# Altium PCB PCB-PWR.PcbDoc (part 2 of 2)
Units mm, origin at the board's own origin, x right, y up, seen from the top; angles counter-clockwise.
Board outline 152.4 x 101.6 mm, 20 copper layers (F.Cu, F.Mask, B.Cu, B.Mask, In1.Cu, F.SilkS, In2.Cu, B.SilkS, F.Adhes, B.Adhes, F.Paste, B.Paste, Dwgs.User, Cmts.User, Eco1.User, Eco2.User, Edge.Cuts, Margin, B.CrtYd, F.CrtYd); 66 components, 31 nets, 210 pads, 267 vias.
Unrouted connection lines stored in the file: 6.
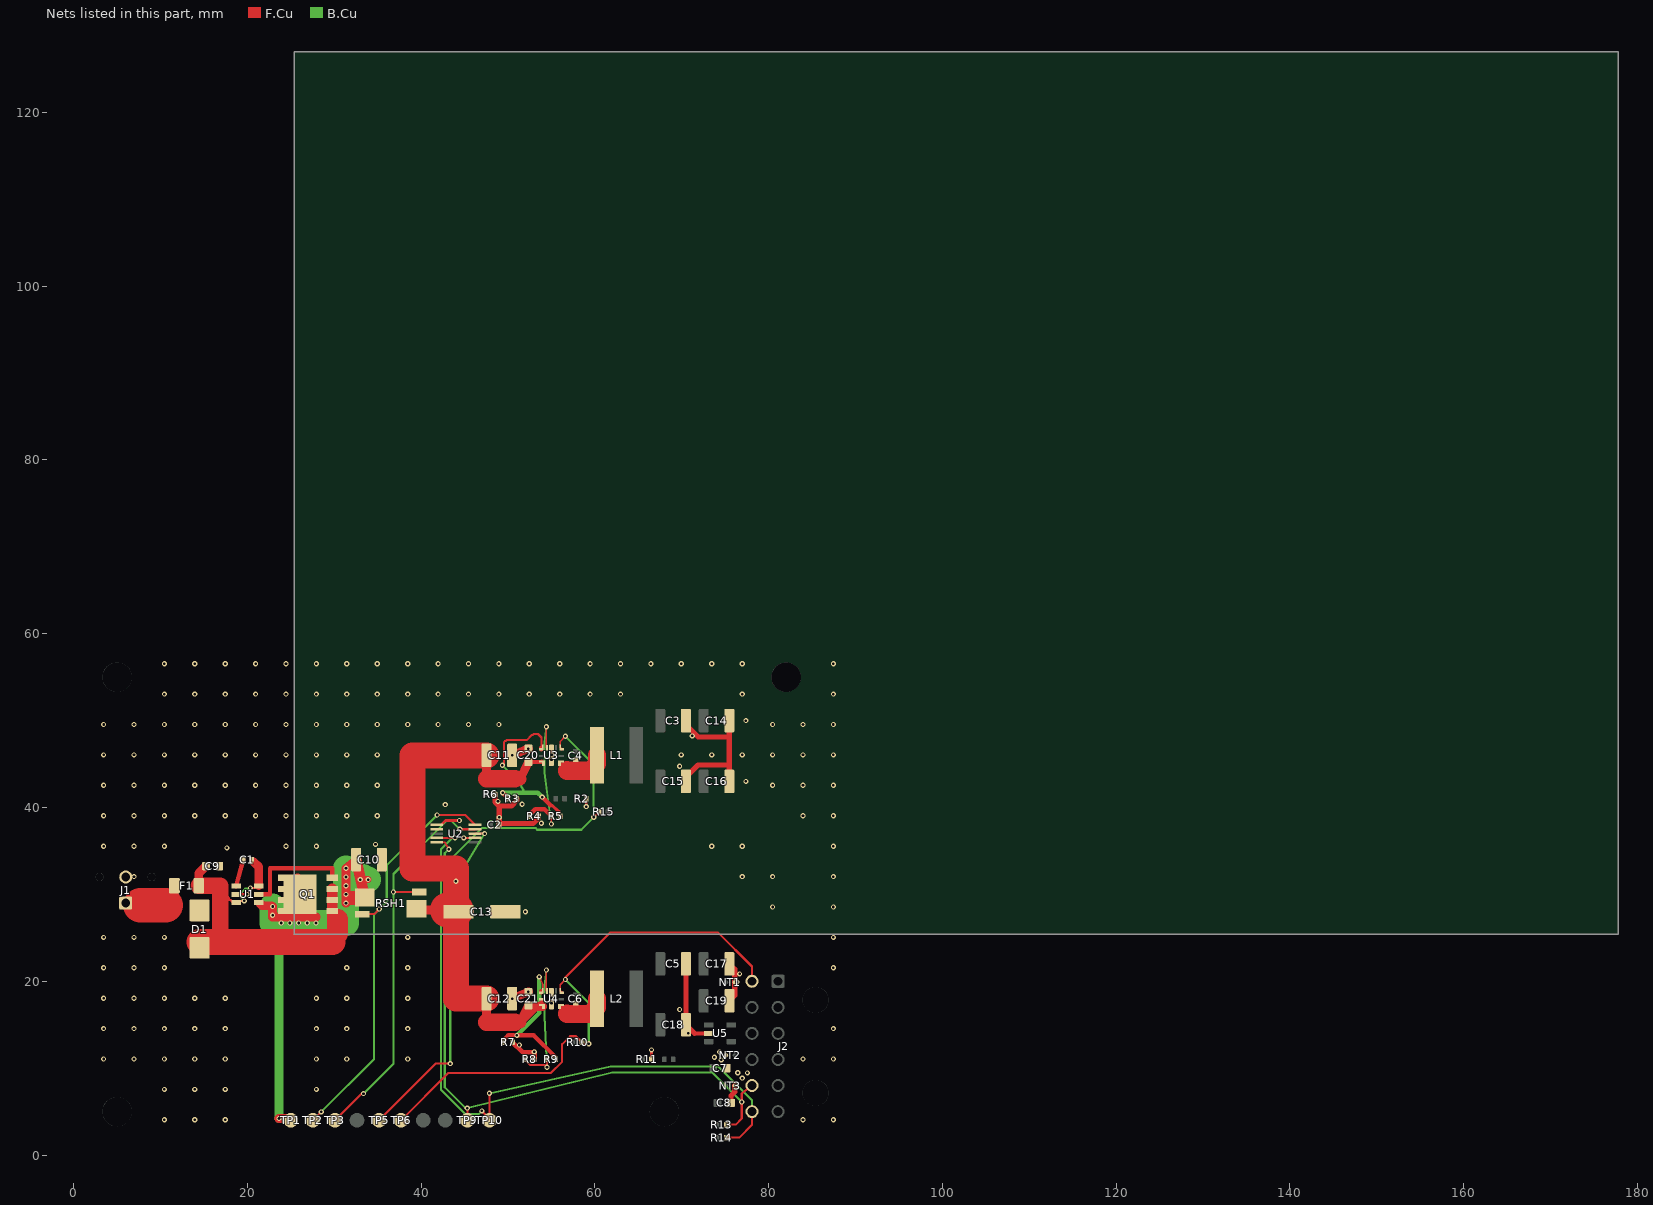
[diagram p10: the nets of this part, all layers, seen from the top]

## Via types
v1: diameter 0.6, hole 0.3, F.Cu to B.Cu, tented both sides, 267 vias

## Nets (pads, with @x,y where several pads share a name; then routed paths per layer and width w, separated by ;. In a path a pad name is that pad's centre, name@x,y a point inside that pad or via, vN(x,y) a via of type N, cw(c..) or ccw(c..) an arc to the next point about the centre after c; other vN are vias at no path point) (continued)
GND_PWR: C2.2 C3.2 C5.2 C7.2 C8.2 C9.2 C10.2 C11.2 C12.2 C13.2 C14.2 C15.2 C16.2 C17.2 C18.2 C19.2 C20.2 C21.2 D1.2 J1.2 NT1.2 NT2.2 NT3.2 R2.2 R3.2 R4.2 R6.2 R7.2 R8.2 R11.2 U1.2 U2.1 U2.2 U2.7 U3.2 U4.2 U5.2 | length 62.2
  F.Cu w0.2: v1(44.9,36.5) U2.7@46.2,36.5
  F.Cu w0.3: U1.2@18.7,30 v1(20,30) ; U2.1@42.3,38 42.8,38.5 v1(44.4,38.5) ; v1(59.01,40.1) R2.2@59.01,41 ; R11.2@66.51,11 v1(66.51,12.1)
  F.Cu w0.45: 71.463,14.002 71.465,14 U5.2@73.1,14
  F.Cu w0.541: R7.2@50.51,13 51.689,11.821 v1@53.01,11.821
  F.Cu w0.6: R6.2@48.51,41.5 48.51,40.648 48.98,40.178 ; C2.2@48.98,38 C2.2@48.98,38.156 ; R3.2@51.01,41 51.01,40.799 50.389,40.178 48.98,40.178 ; R8.2@53.01,11 v1@53.01,11.821 ; R4.2@53.51,39 53.51,38.789 52.877,38.156 C2.2@48.98,38.156 ; U4.2@55,18 v1(55,18.075) ; U3.2@55,46 v1(55,46.075) ; C5.2@70.475,22 C18.2@70.475,15 71.463,14.012 71.463,14.002 ; C15.2@70.475,43 70.475,43.474 71.878,44.877 75.475,44.877 ; C3.2@70.475,50 70.475,49.526 71.894,48.108 75.475,48.108 ; C19.2@75.475,17.75 76.1,18.375 NT1.2@76.1,19.88 76.1,21.375 C17.2@75.475,22 ; C16.2@75.475,43 75.475,44.877 ; C14.2@75.475,50 75.475,48.108 ; C8.2@75.675,6 75.675,6.825 76.1,7.25 NT3.2@76.1,8 ; C2.2@48.98,38.156 48.98,40.178 ; 75.475,44.877 75.475,48.108
  F.Cu w1: v1(50.475,18) v1(52.35,18.775) ; v1(50.475,46) v1(52.35,46.775)
  other v1: 10.45,4.05 13.95,4.05 17.45,4.05 83.95,4.05 87.45,4.05 10.45,7.55 13.95,7.55 17.45,7.55 27.95,7.55 76.95,8.85 77.55,9.45 76.445,9.474 74.55,10.95 3.45,11.05 6.95,11.05 10.45,11.05 13.95,11.05 17.45,11.05 27.95,11.05 31.45,11.05 38.45,11.05 83.95,11.05 87.45,11.05 73.75,11.25 53.01,11.87 74.35,11.85 51.314,12.667 70.75,14 3.45,14.55 6.95,14.55 10.45,14.55 13.95,14.55 17.45,14.55 27.95,14.55 31.45,14.55 38.45,14.55 87.45,14.55 69.748,16.755 55,17.475 3.45,18.05 6.95,18.05 10.45,18.05 13.95,18.05 17.45,18.05 27.95,18.05 31.45,18.05 38.45,18.05 76.336,19.921 76.65,20.85 3.45,21.55 6.95,21.55 10.45,21.55 31.45,21.55 38.45,21.55 87.45,21.55 3.45,25.05 6.95,25.05 10.45,25.05 38.45,25.05 87.45,25.05 52,28 80.45,28.55 87.45,28.55 6.95,32.05 76.95,32.05 80.45,32.05 87.45,32.05 17.646,35.352 3.45,35.55 6.95,35.55 10.45,35.55 24.45,35.55 27.95,35.55 73.45,35.55 76.95,35.55 87.45,35.55 34.748,35.755 53.843,38.196 48.98,38.86 3.45,39.05 6.95,39.05 10.45,39.05 13.95,39.05 17.45,39.05 20.95,39.05 24.45,39.05 27.95,39.05 31.45,39.05 34.95,39.05 83.95,39.05 87.45,39.05 42.766,40.333 51.625,40.385 48.843,40.696 3.45,42.55 6.95,42.55 10.45,42.55 13.95,42.55 17.45,42.55 20.95,42.55 24.45,42.55 27.95,42.55 31.45,42.55 34.95,42.55 80.45,42.55 83.95,42.55 87.45,42.55 77.375,43 69.748,44.755 55,45.475 3.45,46.05 6.95,46.05 10.45,46.05 13.95,46.05 17.45,46.05 20.95,46.05 24.45,46.05 27.95,46.05 31.45,46.05 34.95,46.05 69.95,46.05 73.45,46.05 76.95,46.05 80.45,46.05 83.95,46.05 87.45,46.05 71.202,48.245 3.45,49.55 6.95,49.55 10.45,49.55 13.95,49.55 17.45,49.55 20.95,49.55 24.45,49.55 27.95,49.55 31.45,49.55 34.95,49.55 38.45,49.55 41.95,49.55 45.45,49.55 48.95,49.55 80.45,49.55 83.95,49.55 87.45,49.55 77.375,50 10.45,53.05 13.95,53.05 17.45,53.05 20.95,53.05 24.45,53.05 27.95,53.05 31.45,53.05 34.95,53.05 38.45,53.05 41.95,53.05 45.45,53.05 48.95,53.05 52.45,53.05 55.95,53.05 59.45,53.05 62.95,53.05 76.95,53.05 87.45,53.05 10.45,56.55 13.95,56.55 17.45,56.55 20.95,56.55 24.45,56.55 27.95,56.55 31.45,56.55 34.95,56.55 38.45,56.55 41.95,56.55 45.45,56.55 48.95,56.55 52.45,56.55 55.95,56.55 59.45,56.55 62.95,56.55 66.45,56.55 69.95,56.55 73.45,56.55 76.95,56.55 87.45,56.55
I2C2_SCL: J2.11 R13.2 TP9.1 U2.5 | length 74.4
  F.Cu w0.2: U2.5@41.8,36 42.7,36 v1(43.2,35.2)
  F.Cu w0.25: TP9.1@45.32,4 v1(45.32,5.4) ; R13.2@75.11,3.5 76.2,3.5 76.9,4.2 76.9,7.1 J2.11@78.08,8
  B.Cu w0.25: v1(43.2,35.2) 42.726,34.726 42.726,7.801 45.127,5.4 v1(45.32,5.4) 62,9.5 73.5,9.5 v1(76.9,6.1)
I2C2_SDA: J2.12 R14.2 TP10.1 U2.4 | length 81.1
  F.Cu w0.2: U2.4@41.8,36.5 v1(43.9,36.5)
  F.Cu w0.25: v1(46.994,5.075) 47.86,4.209 TP10.1@47.86,4 v1(47.86,7.1) ; R14.2@75.11,2 76.6,2 78.08,3.5 J2.12@78.08,5
  B.Cu w0.25: v1(43.9,36.5) 43.613,36.5 42.275,35.161 42.275,7.532 45.097,4.71 46.629,4.71 v1(46.994,5.075) ; v1(47.86,7.1) 61.8,10.2 74.2,10.2 78.08,6.32 J2.12@78.08,5
LM74700_VCAP: C1.1 U1.1 | length 3.2
  F.Cu w0.5: U1.1@18.7,30.95 C1.1@19.52,34
MODE_3V3: R8.1 R9.1 U4.7 | length 17.2
  F.Cu w0.2: U4.7@54.415,18.875 v1(54.415,21.3) ; v1(54.49,10.1) R9.1@54.49,11
  F.Cu w0.25: R8.1@52.05,10.85 52.55,10.35 54.25,10.35 54.35,10.25 v1@54.45,10.25
  B.Cu w0.2: v1(54.415,21.3) 54.2,19.5 54.2,16 v1(54.49,10.1)
MODE_3V8: R4.1 R5.1 U3.7 | length 17.8
  F.Cu w0.2: U3.7@54.415,46.875 v1(54.415,49.3) ; v1(54.99,38.1) R5.1@54.99,39
  F.Cu w0.5: R4.1@52.49,39 52.49,39.156 53.128,39.794 54.196,39.794 R5.1@54.99,39
  B.Cu w0.2: v1(54.415,49.3) 54.2,47.5 54.2,44 v1(54.99,38.1)
PG_3V8: R15.1 TP5.1 U3.5 | length 66.5
  F.Cu w0.2: U3.5@56,47.1 56,47.6 v1(56.6,48.2)
  F.Cu w0.201: U3.5@56,47.1 U3.5@56,46.9 56.01,46.9 U3.5@56.112,46.798
  F.Cu w0.25: TP5.1@35.16,4 41.686,10.526 v1(43.357,10.526) ; U3.5@56.112,46.798 56.175,46.735 U3.5@56.175,46.7 ; v1(59.857,38.867) R15.1@60.49,39.5
  B.Cu w0.25: v1(43.357,10.526) 43.357,33.978 47.031,37.652 53.156,37.652 53.363,37.444 58.435,37.444 v1(59.857,38.867) 59.857,44.943 v1(56.6,48.2)
PWR_GOOD: J2.7 R10.2 TP6.1 U4.5 | length 64.7
  F.Cu w0.2: U4.5@56,19.1 56,19.6 v1(56.6,20.2)
  F.Cu w0.201: U4.5@56,19.1 U4.5@56,18.9 56.01,18.9 U4.5@56.112,18.798
  F.Cu w0.25: TP6.1@37.7,4 43.16,9.46 54.944,9.46 56.225,10.741 56.225,12.751 57.149,13.676 57.834,13.676 R10.2@58.51,13 58.71,12.8 v1(59.296,12.8) ; U4.5@56.112,18.798 56.175,18.735 U4.5@56.175,18.7 ; v1(56.6,20.2) 56.6,20.429 61.797,25.627 74.148,25.627 78.08,21.695 J2.7@78.08,20
  B.Cu w0.25: v1(56.6,20.2) 59.296,17.504 v1(59.296,12.8)
REV_GATE: Q1.4 U1.5 | length 12.6
  F.Cu w0.5: U1.5@21.3,30 22.6,30 22.6,33 29.77,33 Q1.4@29.77,31.905
RT_3V3: R7.1 R9.2 U4.8 | length 17.6
  F.Cu w0.2: v1(53.6,20.5) 54,19.7 U4.8@54,19.1
  F.Cu w0.201: 53.825,18.86 53.865,18.9 U4.8@54,18.9 U4.8@54,19.1
  F.Cu w0.375: 50.667,13.81 50.707,13.771 v1(51.018,13.771) v1(51.018,13.771)
  F.Cu w0.5: R7.1@49.49,13 49.49,13.256 50.045,13.81 50.667,13.81 ; v1(51.018,13.771) 52.953,13.771 55.51,11.214 R9.2@55.51,11 ; U4.8@53.825,18.7 53.825,18.86
  B.Cu w0.5: v1(51.018,13.771) 53.6,16.353 v1(53.6,20.5)
RT_3V8: R3.1 R5.2 U3.8 | length 22.1
  F.Cu w0.201: 53.825,46.86 53.865,46.9 U3.8@54,46.9
  F.Cu w0.25: v1(49.35,44.85) 49.55,45.05 49.55,47.55 49.65,47.65 49.75,47.65 49.85,47.75 52.15,47.75 52.75,48.35 52.85,48.35 52.95,48.45 53.45,48.45 53.85,48.05 53.85,46.95
  F.Cu w0.375: 54.909,40.229 55.114,40.229 55.8,39.543
  F.Cu w0.5: v1(49.372,41.705) 49.99,41.088 R3.1@49.99,41 ; U3.8@53.825,46.7 53.825,46.86 ; v1(53.939,41.199) 54.909,40.229 ; 55.8,39.543 55.8,39.21 R5.2@56.01,39
  B.Cu w0.25: v1(49.35,44.85) 51.35,42.85 51.35,42.75 51.45,42.65 51.45,42.55 51.55,42.45 51.55,42.35 51.65,42.25 51.65,42.15 51.75,42.05 51.75,41.85 51.85,41.75
  B.Cu w0.5: v1(49.372,41.705) 53.433,41.705 v1(53.939,41.199)
SHUNT_LOAD_SENSE: RSH1.4 TP3.1 U2.9 | length 46.5
  F.Cu w0.25: TP3.1@30.08,4 33.147,7.067 v1(33.362,7.067) ; v1(36.811,30.27) RSH1.4@39.78,30.27 ; v1(44.45,37.5) U2.9@46.2,37.5
  B.Cu w0.25: v1(33.362,7.067) 36.811,10.516 v1(36.811,30.27) 36.811,32.351 42.887,38.427 43.523,38.427 v1(44.45,37.5)
SHUNT_SOURCE_SENSE: RSH1.3 TP2.1 U2.10 | length 48.1
  F.Cu w0.25: TP2.1@27.54,4 v1(28.504,4.964) ; RSH1.3@33.22,27.73 34.397,27.73 34.59,27.73 v1(35.18,28.32) ; v1(41.841,39.132) 45.067,39.132 U2.10@46.2,38
  B.Cu w0.25: v1(28.504,4.964) 34.59,11.05 34.59,27.73 v1(35.18,28.32) 36.043,29.183 36.043,33.335 v1(41.841,39.132)
SW_3V3: C6.2 L2.1 U4.3 | length 6
  F.Cu w0.251: U4.3@56.086,17.013 56.75,16.35
  F.Cu w0.346: U4.3@55.927,17.1 56,17.1 U4.3@56.086,17.013
  F.Cu w0.561: 56.75,16.349 56.8,16.3
  F.Cu w2.1: 56.8,16.3 56.8,16.22 59.45,16.22 60.24,17.01 L2.1@60.24,18
SW_3V8: C4.2 L1.1 U3.3 | length 6
  F.Cu w0.251: U3.3@56.086,45.013 56.75,44.35
  F.Cu w0.346: U3.3@55.927,45.1 56,45.1 U3.3@56.086,45.013
  F.Cu w0.561: 56.75,44.349 56.8,44.3
  F.Cu w2.1: 56.8,44.3 56.8,44.22 59.45,44.22 60.24,45.01 L1.1@60.24,46
VBAT_FUSED: C1.2 C9.1 D1.1 F1.2 Q1.1 Q1.2 Q1.3 U1.3 U1.6 | length 45.9
  F.Cu w0.25: 17.25,30.25 17.75,29.75 17.75,29.65 17.85,29.55 17.85,29.45 17.95,29.35 18.05,29.35 18.25,29.15 U1.3@18.35,29.15 ; U1.3@19.05,29.15 19.15,29.25 v1(19.65,29.25) ; v1(20.35,30.75) 20.85,30.75 U1.6@20.95,30.85
  F.Cu w0.561: C1.2@20.48,34 C1.2@20.749,33.731
  F.Cu w0.601: U1.6@21.3,30.95 U1.6@21.3,31.002
  F.Cu w1: F1.2@14.4,31 14.4,32.425 C9.1@15.225,33.25 ; D1.1@14.5,23.85 15.15,24.5 16.9,24.5 ; C1.2@20.749,33.731 21.3,33.18 U1.6@21.3,31.002
  F.Cu w1.2: 29.77,24.5 Q1.3@29.77,30.635
  F.Cu w1.9: F1.2@14.4,31 16.9,31 16.9,24.5
  F.Cu w2.4: 30.4,25.5 30.4,27.1
  F.Cu w3: D1.1@14.5,24.5 29.77,24.5
  B.Cu w0.25: v1(19.65,29.25) 19.35,29.55 19.35,30.25 19.75,30.65 20.25,30.65 v1(20.35,30.75)
VBAT_PROTECTED: C10.1 Q1.5 Q1.6 Q1.7 Q1.8 RSH1.1 TP1.1 U1.4 | length 70.8
  F.Cu w0.601: U1.4@21.3,29.05 U1.4@21.471,28.879 ; 21.643,28.707 U1.4@21.643,28.879
  F.Cu w0.8: v1(33,31.7) v1(33.9,31.7)
  F.Cu w1: U1.4@21.471,28.879 U1.4@21.643,28.879 ; 21.643,28.707 22.793,28.707 v1(22.9,28.6) 22.9,27.4 27.9,27.4 ; v1(23.646,4.2) 24.8,4.2 TP1.1@25,4 ; Q1.8@25.764,28.095 25.764,28.435 Q1.5@26.059,28.73 26.059,29.07 Q1.7@25.764,29.365 25.764,29.705 Q1.5@26.059,30 25.764,30.295 Q1.6@25.764,30.635 26.059,30.93 Q1.5@26.059,31.27 25.764,31.565 Q1.5@25.764,31.905 ; v1(31.35,29) v1(31.35,33) C10.1@32.525,34 ; v1(31.35,30) v1(31.35,31) ; RSH1.1@32.6,29.6 33.48,29.6 RSH1.1@33.515,29.635
  F.Cu w1.2: C10.1@32.525,34 RSH1.1@33.515,29.635
  F.Cu w1.6: 31.85,29.6 RSH1.1@32.6,29.6
  B.Cu w1: v1(23.646,4.2) 23.646,26.446 v1(23.9,26.7) ; v1(31.35,31) v1(31.35,32)
  B.Cu w3: v1(22.9,28.6) 22.9,26.7 31.35,26.7 v1(31.35,33) v1(33.9,31.7)
  other v1: 24.9,26.7 25.9,26.7 26.9,26.7 27.9,26.7 22.9,27.6
VBAT_RAW: F1.1 J1.1 | length 7.4
  F.Cu w1: J1.1@6,29 6.25,28.75 7.7,28.75 ; 10.6,28.75 11.6,29.75 F1.1@11.6,31
  F.Cu w4: 7.7,28.75 10.6,28.75
VBAT_SYS: C11.1 C12.1 C13.1 C20.1 C21.1 RSH1.2 U2.8 U3.1 U4.1 U4.9 | length 82.6
  F.Cu w0.2: U2.8@46.2,37 v1(47.3,37)
  F.Cu w0.25: U4.9@53.875,17.925 U4.1@53.9,17.25
  F.Cu w0.251: U3.1@53.897,45.275 U3.1@54.073,45.1
  F.Cu w0.346: U4.1@53.998,17.1 U4.1@54.073,17.1
  F.Cu w0.5: C21.1@52.35,17.225 U4.1@53.9,17.25 ; C20.1@52.35,45.225 U3.1@53.9,45.25
  F.Cu w1: RSH1.2@39.485,28.365 39.65,28.2 40,28.2 C13.1@43,28.2 ; C13.1@44,28.2 44.2,28 C13.1@44.3,28 ; 47.525,15.3 C12.1@47.525,18 ; 47.525,43.3 C11.1@47.525,46 ; 51.4,43.3 C20.1@52.35,45.225 ; C21.1@52.35,17.225 51.4,15.3 53.2,17.1 53.897,17.1 ; U4.1@53.897,17.275 53.897,17.1 ; U4.1@53.998,17.1 53.897,17.1
  F.Cu w1.5: 50.8,15.3 51.4,15.3 ; 50.8,43.3 51.4,43.3
  F.Cu w2: 47.525,15.3 50.8,15.3 ; 47.525,43.3 50.8,43.3
  F.Cu w3: C12.1@47.525,18 44,18 44,28.2 44,33 39,33 39,46 C11.1@47.525,46
  F.Cu w4: C13.1@43,28.2 C13.1@44,28.2
  B.Cu w0.25: v1(44,31.5) v1(47.3,37)
pads on no net: H1.Un1 H2.Un1 H3.Un1 H4.Un1 J1.Un1 J1.Un2 J2.Un1 J2.Un2 Q1.Un1 Q1.Un2 Q1.Un3 Q1.Un4 Q1.Un5 Q1.Un6 Q1.Un7 Q1.Un8 Q1.Un9 Q1.Un10 Q1.Un11 Q1.Un12 Q1.Un13 Q1.Un14 Q1.Un15 Q1.Un16 U3.Un1 U3.Un2 U3.Un3 U3.Un4 U3.Un5 U3.Un6 U3.Un7 U4.Un1 U4.Un2 U4.Un3 U4.Un4 U4.Un5 U4.Un6 U4.Un7 U5.4
copper on no net: | length 300
  Edge.Cuts w0.254: 0,0 90,0 90,60 0,60 0,0

## Polygon pours and split planes (outlines as drawn)
VBAT_RAW on F.Cu "F.Cu-VBAT_RAW" (solid, remove dead copper, pour order 48): 13.146,28.481 13.448,28.985 13.59,29.554 13.6,31 13.514,31.581 13.263,32.111 12.869,32.546 12.365,32.848 11.796,32.99 11.404,32.99 11.019,32.914 10.657,32.764 10.186,32.414 9.836,31.943 9.686,31.581 9.61,31.196 9.6,30.75 6.966,30.75 6.581,30.914 6,31 5.419,30.914 4.889,30.663 4.454,30.269 4.152,29.765 4.01,29.196 4.01,28.804 4.086,28.419 4.236,28.057 4.454,27.731 4.836,27.336 5.139,27.087 5.669,26.836 6.054,26.76 10.6,26.75 10.99,26.788 11.543,26.986 11.869,27.204
VBAT_SYS on F.Cu "F.Cu-VBAT_SYS-1" (solid, remove dead copper, pour order 51): 152 vertices, not listed, extent 37,13.3 56.072,48
3V3_DIGITAL on F.Cu "F.Cu-3V3_DIGITAL-3" (solid, remove dead copper, pour order 36): 49.447,38.633 49.261,38.861 49.033,39.047 48.635,39.235 48.347,39.293 48.053,39.293 47.765,39.235 47.493,39.123 47.248,38.96 47.041,38.752 46.814,38.374 46.707,37.947 46.7,37.5 46.053,37.493 45.626,37.386 45.367,37.247 45.139,37.061 44.877,36.707 44.729,36.293 44.707,35.853 44.814,35.426 45.04,35.048 45.248,34.84 45.493,34.677 45.765,34.565 46.053,34.507 47.847,34.507 48.274,34.614 48.652,34.84 49.359,35.548 49.586,35.926 49.671,36.207 49.7,36.5 49.693,37.947 49.586,38.374
GND_PWR on F.Cu "F.Cu-GND_PWR" (solid, remove dead copper, pour order 52): 0.45,59.55 89.55,59.55 89.55,0.45 0.45,0.45
3V8_MODEM on F.Cu "F.Cu-3V8_MODEM-1" (solid, remove dead copper, pour order 39): 49.029,9.425 48.757,9.537 48.322,9.602 47.15,9.602 46.714,9.537 46.316,9.349 45.99,9.053 45.764,8.676 45.678,8.394 45.657,7.955 45.764,7.528 45.99,7.15 46.198,6.942 46.576,6.716 46.857,6.63 47.7,6.602 47.912,6.39 47.895,3.948 34.793,3.948 33.681,5.061 33.453,5.247 33.055,5.435 32.62,5.5 32.185,5.435 31.913,5.323 31.668,5.159 31.373,4.833 31.185,4.435 31.127,4.147 31.127,3.853 31.185,3.565 31.297,3.293 31.461,3.048 33.111,1.387 33.339,1.201 33.598,1.062 34.025,0.955 48.516,0.948 48.952,1.012 49.224,1.125 49.468,1.288 50.571,2.392 50.798,2.769 50.883,3.051 50.912,3.343 50.912,7.012 50.847,7.447 50.659,7.845 50.472,8.072 49.382,9.162
VBAT_FUSED on F.Cu "F.Cu-VBAT_FUSED" (solid, remove dead copper, pour order 44): 12.552,33.19 12.41,32.621 12.4,31 12.438,30.61 12.636,30.057 12.854,29.731 13.131,29.454 13.635,29.152 14.204,29.01 14.9,29 14.9,26.5 14.11,26.462 13.735,26.348 13.389,26.163 13.086,25.914 12.837,25.611 12.652,25.265 12.538,24.89 12.5,24.5 12.529,24.175 12.51,23.654 12.652,23.085 12.837,22.739 13.086,22.436 13.389,22.187 13.735,22.002 14.304,21.86 14.89,21.888 15.443,22.086 15.769,22.304 15.978,22.5 29.966,22.51 30.351,22.586 30.713,22.736 31.184,23.086 31.534,23.557 31.699,23.982 32.063,24.389 32.248,24.735 32.39,25.304 32.39,27.296 32.314,27.681 32.164,28.043 31.946,28.369 31.77,28.554 31.77,30.635 31.732,31.025 31.534,31.578 31.316,31.904 30.881,32.298 30.535,32.483 30.16,32.597 29.77,32.635 29.38,32.597 29.005,32.483 28.659,32.298 28.356,32.049 28.107,31.746 27.922,31.4 27.808,31.025 27.77,30.635 27.77,26.5 18.9,26.5 18.9,27.157 19.246,27.16 19.672,27.251 20.04,27.288 20.415,27.402 20.761,27.587 21.064,27.836 21.313,28.139 21.498,28.485 21.618,28.903 22.243,29.186 22.569,29.404 22.846,29.681 23.148,30.185 23.262,30.56 23.3,30.95 23.29,33.376 23.214,33.761 23.064,34.123 22.714,34.594 21.749,35.546 21.423,35.764 21.061,35.914 20.676,35.99 20.284,35.99 19.899,35.914 19.369,35.663 19.066,35.414 18.817,35.111 18.632,34.765 18.518,34.39 18.49,33.804 18.632,33.235 18.817,32.889 19.239,32.413 18.936,32.164 18.697,31.874 18.446,32.269 18.011,32.663 17.665,32.848 17.204,32.974 17.215,33.446 17.139,33.831 16.888,34.361 16.639,34.664 16.168,35.014 15.615,35.212 15.225,35.25 14.835,35.212 14.46,35.098 14.114,34.913 13.811,34.664 12.986,33.839 12.737,33.536
GND_DIGITAL on F.Cu "F.Cu-GND_DIGITAL" (solid, remove dead copper, pour order 40): 75.8,13.6 82.6,13.6 82.6,9.6 75.8,9.6
3V3_DIGITAL on F.Cu "F.Cu-3V3_DIGITAL-2" (solid, remove dead copper, pour order 35): 56.832,21.633 56.537,21.959 56.159,22.186 55.732,22.293 55.438,22.293 55.011,22.186 54.633,21.959 54.425,21.752 54.199,21.374 54.114,21.093 54.085,20.8 54.085,18.875 54.114,18.582 54.199,18.301 54.425,17.923 54.633,17.715 55.011,17.489 55.292,17.404 55.585,17.375 55.878,17.404 56.159,17.489 56.418,17.628 56.646,17.814 56.832,18.042 56.971,18.301 57.056,18.582 57.085,18.875 57.085,20.8 57.02,21.235
GND_MODEM on F.Cu "F.Cu-GND_MODEM" (solid, remove dead copper, pour order 42): 73.603,20.483 73.227,19.957 73.079,19.543 73.05,19.25 73.05,18.195 72.879,17.743 72.85,17.45 72.879,17.157 72.964,16.876 73.103,16.617 73.289,16.389 73.517,16.203 73.776,16.064 74.057,15.979 74.35,15.95 74.643,15.979 75.057,16.127 75.302,16.29 75.71,16.698 75.936,17.076 76.043,17.503 76.05,18.653 76.373,19.143 76.485,19.415 76.55,19.85 76.521,20.143 76.436,20.424 76.297,20.683 76.002,21.009 75.624,21.236 75.197,21.343 74.757,21.321 74.343,21.173 73.989,20.911
3V3_DIGITAL on F.Cu "F.Cu-3V3_DIGITAL-1" (solid, remove dead copper, pour order 34): 207 vertices, not listed, extent 55.99,0.507 75.59,26.493
VBAT_PROTECTED on F.Cu "F.Cu-VBAT_PROTECTED-1" (solid, remove dead copper, pour order 47): 26.069,5.746 25.743,5.964 25.381,6.114 24.8,6.2 23.646,6.2 23.256,6.162 22.881,6.048 22.535,5.863 22.232,5.614 21.983,5.311 21.798,4.965 21.684,4.59 21.646,4.2 21.684,3.81 21.798,3.435 21.983,3.089 22.232,2.786 22.535,2.537 22.881,2.352 23.256,2.238 23.646,2.2 24.133,2.2 24.61,2.038 25,2 25.581,2.086 26.111,2.337 26.546,2.731 26.764,3.057 26.914,3.419 27,4 26.914,4.581 26.764,4.943 26.546,5.269
VBAT_PROTECTED on F.Cu "F.Cu-VBAT_PROTECTED" (solid, remove dead copper, pour order 46): 27.427,33.016 27.178,33.319 26.875,33.568 26.345,33.819 25.764,33.905 25.183,33.819 24.821,33.669 24.35,33.319 24.101,33.016 23.916,32.67 23.774,32.101 23.764,31.565 23.821,31.1 23.774,30.831 23.764,30.454 23.558,30.555 23.183,30.669 22.449,30.707 21.881,30.964 21.496,31.04 21.104,31.04 20.719,30.964 20.189,30.713 19.886,30.464 19.637,30.161 19.452,29.815 19.338,29.44 19.3,29.05 19.338,28.66 19.452,28.285 19.637,27.939 19.886,27.636 20.374,27.161 20.7,26.943 20.986,26.821 21.136,26.457 21.486,25.986 21.957,25.636 22.319,25.486 22.9,25.4 27.9,25.4 28.29,25.438 28.665,25.552 29.011,25.737 29.446,26.131 29.664,26.457 29.814,26.819 29.89,27.204 29.883,27.644 30.239,27.337 30.769,27.086 31.35,27 31.74,27.038 32.293,27.236 32.619,27.454 32.777,27.6 33.676,27.61 34.245,27.752 34.591,27.937 34.894,28.186 35.094,28.408 35.279,28.692 35.444,29.106 35.51,29.492 35.499,29.884 35.397,30.377 35.664,30.757 35.862,31.31 35.9,31.7 35.814,32.281 35.664,32.643 35.446,32.969 35.169,33.246 34.68,33.541 34.428,34.615 34.352,34.814 34.168,35.141 33.901,35.451 33.436,35.78 33.071,35.924 32.668,35.995 32.1,35.954 31.711,35.827 31.229,35.523 30.054,34.523 29.781,34.241 29.586,33.943 29.436,33.581 29.356,33.16 29.367,28.756 29.169,28.946 28.843,29.164 28.481,29.314 28.03,29.394 28.002,29.535 28.059,30 28.002,30.465 28.049,30.734 28.059,31.27 28.021,31.66 27.907,32.035 27.695,32.418 27.612,32.67
3V8_MODEM on F.Cu "F.Cu-3V8_MODEM" (solid, remove dead copper, pour order 38): 152 vertices, not listed, extent 54.05,18.507 85,54.7
VBAT_SYS on F.Cu "F.Cu-VBAT_SYS" (solid, remove dead copper, pour order 50): 48.243,35.236 48.569,35.454 48.963,35.889 49.214,36.419 49.29,36.804 49.262,37.39 49.148,37.765 48.846,38.269 48.569,38.546 48.065,38.848 47.69,38.962 47.3,39 46.004,38.99 45.619,38.914 45.257,38.764 44.931,38.546 44.654,38.269 44.436,37.943 44.286,37.581 44.21,37.196 44.21,36.804 44.286,36.419 44.436,36.057 44.654,35.731 44.931,35.454 45.435,35.152 46.004,35.01 47.496,35.01 47.881,35.086
3V3_DIGITAL on F.Cu "F.Cu-3V3_DIGITAL" (solid, remove dead copper, pour order 33): 62.833,40.207 62.669,40.452 62.343,40.747 61.945,40.935 61.657,40.993 61.363,40.993 60.936,40.886 60.677,40.747 60.35,40.452 60.124,40.074 60.039,39.793 60.01,39.5 60.017,38.453 60.075,38.165 60.187,37.893 60.35,37.648 60.558,37.44 60.803,37.277 61.075,37.165 61.363,37.107 61.657,37.107 61.945,37.165 62.217,37.277 62.462,37.44 62.669,37.648 62.896,38.026 63.003,38.453 63.003,39.647 62.945,39.935
VBAT_FUSED on B.Cu "B.Cu-VBAT_FUSED" (solid, remove dead copper, pour order 43): 21.664,29.236 22.013,29.639 22.264,30.169 22.35,30.75 22.312,31.14 22.114,31.693 21.896,32.019 21.461,32.413 21.115,32.598 20.74,32.712 20.35,32.75 19.36,32.612 18.985,32.498 18.481,32.196 17.936,31.664 17.687,31.361 17.502,31.015 17.388,30.64 17.35,30.25 17.36,29.354 17.502,28.785 17.687,28.439 17.936,28.136 18.381,27.704 18.885,27.402 19.454,27.26 19.846,27.26 20.415,27.402 20.761,27.587 21.064,27.836 21.414,28.307 21.564,28.669
3V3_DIGITAL on B.Cu "B.Cu-3V3_DIGITAL-2" (solid, remove dead copper, pour order 32): 84.421,22.293 84.336,22.574 84.197,22.833 83.902,23.159 83.524,23.386 83.097,23.493 76.5,23.5 76.207,23.471 75.866,23.359 71.366,21.259 71.113,21.109 70.894,20.913 70.647,20.548 70.517,20.128 70.515,19.688 70.641,19.266 70.791,19.013 70.987,18.794 71.222,18.617 71.487,18.49 71.772,18.417 72.066,18.401 72.357,18.443 72.634,18.541 76.833,20.5 81.45,20.5 81.45,16.22 80.141,15.17 79.931,14.964 79.701,14.589 79.612,14.309 79.58,14.017 79.606,13.724 79.688,13.441 79.91,13.061 80.115,12.851 80.49,12.621 80.771,12.532 81.063,12.5 81.356,12.526 81.639,12.608 81.899,12.744 83.902,14.34 84.197,14.667 84.38,15.049 84.45,15.483 84.45,22
3V8_MODEM on B.Cu "B.Cu-3V8_MODEM" (solid, remove dead copper, pour order 37): 65.574,24.158 65.16,24.01 64.898,23.831 53.326,23.831 53.034,23.802 52.753,23.717 52.375,23.49 46.089,17.215 45.902,16.987 45.764,16.728 45.678,16.447 45.65,16.154 45.65,8.102 45.678,7.809 45.764,7.528 45.99,7.15 46.198,6.942 46.576,6.716 47.003,6.609 47.297,6.609 47.724,6.716 47.983,6.854 48.309,7.15 48.472,7.395 48.585,7.666 48.65,8.102 48.65,15.533 53.948,20.831 65.51,20.831 65.946,20.896 66.24,21.022 69.906,17.367 70.15,17.204 70.422,17.091 70.857,17.026 79.607,17.026 79.899,17.055 80.314,17.204 80.667,17.466 82.24,19.048 82.403,19.293 82.515,19.565 82.58,20 82.551,20.293 82.466,20.574 82.24,20.952 82.032,21.16 81.654,21.386 81.373,21.471 81.08,21.5 80.645,21.435 80.247,21.247 80.019,21.061 78.985,20.027 71.479,20.027 67.757,23.748 67.53,23.934 67.27,24.073 66.843,24.18 65.867,24.187
VBAT_SYS on B.Cu "B.Cu-VBAT_SYS" (solid, remove dead copper, pour order 49): 42.285,32.529 42.06,31.987 42.002,31.599 42.022,31.207 42.192,30.646 42.393,30.309 42.656,30.019 42.971,29.785 43.325,29.617 43.706,29.522 44.097,29.502 44.673,29.617 45.027,29.784 45.342,30.017 45.715,30.471 49.015,35.971 49.183,36.325 49.298,36.901 49.24,37.485 49.108,37.854 48.783,38.342 48.492,38.606 48.156,38.808 47.787,38.94 47.399,38.997 47.007,38.978 46.627,38.883 46.273,38.716 45.958,38.482 45.585,38.029
VBAT_PROTECTED on B.Cu "B.Cu-VBAT_PROTECTED" (solid, remove dead copper, pour order 45): 33.548,29.731 34.135,29.714 34.518,29.798 35.043,30.059 35.47,30.461 35.762,30.971 35.869,31.348 35.886,31.935 35.733,32.501 35.421,32.999 35.138,33.27 34.808,33.482 32.115,34.848 31.74,34.962 31.311,35 30.96,34.962 30.732,34.902 30.407,34.764 30.207,34.641 29.936,34.414 29.78,34.238 29.568,33.908 29.436,33.581 29.381,33.352 29.35,33 29.35,28.7 24.895,28.7 24.862,28.99 24.748,29.365 24.563,29.711 24.314,30.014 23.843,30.364 23.481,30.514 23.096,30.59 22.51,30.562 21.957,30.364 21.486,30.014 21.237,29.711 21.052,29.365 20.91,28.796 20.91,26.504 20.986,26.119 21.136,25.757 21.354,25.431 21.646,25.143 21.656,4.004 21.798,3.435 22.1,2.931 22.377,2.654 22.881,2.352 23.45,2.21 23.842,2.21 24.227,2.286 24.757,2.537 25.192,2.931 25.41,3.257 25.56,3.619 25.636,4.004 25.646,24.7 31.546,24.71 31.931,24.786 32.461,25.037 32.764,25.286 33.013,25.589 33.198,25.935 33.312,26.31 33.35,26.7 33.35,29.777
GND_PWR on B.Cu "B.Cu-GND_PWR" (solid, remove dead copper, pour order 53): 0.45,59.55 89.55,59.55 89.55,0.45 0.45,0.45
GND_MODEM on B.Cu "B.Cu-GND_MODEM" (solid, remove dead copper, pour order 41): 76.624,18.836 76.197,18.943 74.35,18.95 73.915,18.885 73.517,18.697 73.289,18.511 73.103,18.283 72.964,18.024 72.879,17.743 72.85,17.45 72.879,17.157 72.964,16.876 73.103,16.617 73.398,16.29 73.643,16.127 73.915,16.015 74.35,15.95 75.429,15.95 76.389,14.989 76.617,14.803 77.076,14.564 77.515,14.415 77.803,14.357 78.797,14.357 79.224,14.464 79.811,14.76 80.257,14.927 81.257,15.427 81.611,15.689 81.873,16.043 81.985,16.315 82.043,16.603 82.043,16.897 81.985,17.185 81.873,17.457 81.709,17.702 81.502,17.909 81.257,18.073 80.985,18.185 80.697,18.243 80.157,18.221 79.876,18.136 79.089,17.74 78.776,17.636 78.275,17.388 78.219,17.402 77.002,18.61
3V3_DIGITAL on B.Cu "B.Cu-3V3_DIGITAL-1" (solid, remove dead copper, pour order 31): 56.259,11.243 56.561,10.922 56.808,10.764 57.082,10.656 57.372,10.605 57.666,10.61 58.091,10.726 58.464,10.959 58.753,11.291 58.933,11.692 58.985,11.982 58.98,12.276 57.012,21.263 56.894,21.532 56.726,21.774 56.394,22.063 55.993,22.243 55.703,22.295 55.409,22.29 55.122,22.227 54.853,22.109 54.611,21.941 54.407,21.729 54.249,21.481 54.141,21.208 54.09,20.918 54.095,20.624 56.025,11.779 56.116,11.499
3V3_DIGITAL on B.Cu "B.Cu-3V3_DIGITAL" (solid, remove dead copper, pour order 30): 62.945,39.035 62.833,39.307 62.669,39.552 62.343,39.847 62.084,39.986 61.657,40.093 61.363,40.093 61.075,40.035 60.803,39.923 60.558,39.759 60.35,39.552 60.187,39.307 60.075,39.035 60.01,38.6 60.01,37.5 47.7,37.5 47.407,37.471 47.126,37.386 46.867,37.247 46.639,37.061 46.453,36.833 46.314,36.574 46.229,36.293 46.2,36 46.229,35.707 46.377,35.293 46.639,34.939 46.993,34.677 47.265,34.565 47.553,34.507 60.887,34.5 63,32.38 63,25 63.065,24.565 63.253,24.167 63.439,23.939 63.667,23.753 63.926,23.614 64.207,23.529 64.5,23.5 64.793,23.529 65.074,23.614 65.333,23.753 65.659,24.048 65.886,24.426 65.993,24.853 65.993,33.147 65.886,33.574 65.659,33.952 63.01,36.62 63.01,38.6
GND_PWR on In1.Cu "In1.Cu-GND_PWR-2" (solid, remove dead copper, pour order 29): 49.8,47.6 55.35,47.6 55.35,44.4 49.8,44.4
GND_PWR on In1.Cu "In1.Cu-GND_PWR-1" (solid, remove dead copper, pour order 28): 49.8,19.6 55.35,19.6 55.35,16.4 49.8,16.4
GND_PWR on In1.Cu "In1.Cu-GND_PWR" (solid, remove dead copper, pour order 54): 0.45,59.55 89.55,59.55 89.55,0.45 0.45,0.45
GND_PWR on In2.Cu "In2.Cu-GND_PWR" (solid, remove dead copper, pour order 55): 0.45,59.55 89.55,59.55 89.55,0.45 0.45,0.45

## Keep-outs
F.Cu:
  region: 82.78,58.923 83.531,58.696 84.222,58.326 84.828,57.828 85.326,57.222 85.696,56.531 85.923,55.78 86,55 85.923,54.22 85.696,53.469 85.326,52.778 84.828,52.172 84.222,51.674 83.531,51.304 82.78,51.077 82,51 81.22,51.077 80.469,51.304 79.778,51.674 79.172,52.172 78.674,52.778 78.304,53.469 78.077,54.22 78,55 78.077,55.78 78.304,56.531 78.674,57.222 79.172,57.828 79.778,58.326 80.469,58.696 81.22,58.923 82,59
  region: 5.78,8.923 6.531,8.696 7.222,8.326 7.828,7.828 8.326,7.222 8.696,6.531 8.923,5.78 9,5 8.923,4.22 8.696,3.469 8.326,2.778 7.828,2.172 7.222,1.674 6.531,1.304 5.78,1.077 5,1 4.22,1.077 3.469,1.304 2.778,1.674 2.172,2.172 1.674,2.778 1.304,3.469 1.077,4.22 1,5 1.077,5.78 1.304,6.531 1.674,7.222 2.172,7.828 2.778,8.326 3.469,8.696 4.22,8.923 5,9
  region: 68.78,8.923 69.531,8.696 70.222,8.326 70.828,7.828 71.326,7.222 71.696,6.531 71.923,5.78 72,5 71.923,4.22 71.696,3.469 71.326,2.778 70.828,2.172 70.222,1.674 69.531,1.304 68.78,1.077 68,1 67.22,1.077 66.469,1.304 65.778,1.674 65.172,2.172 64.674,2.778 64.304,3.469 64.077,4.22 64,5 64.077,5.78 64.304,6.531 64.674,7.222 65.172,7.828 65.778,8.326 66.469,8.696 67.22,8.923 68,9
  region: 5.78,58.923 6.531,58.696 7.222,58.326 7.828,57.828 8.326,57.222 8.696,56.531 8.923,55.78 9,55 8.923,54.22 8.696,53.469 8.326,52.778 7.828,52.172 7.222,51.674 6.531,51.304 5.78,51.077 5,51 4.22,51.077 3.469,51.304 2.778,51.674 2.172,52.172 1.674,52.778 1.304,53.469 1.077,54.22 1,55 1.077,55.78 1.304,56.531 1.674,57.222 2.172,57.828 2.778,58.326 3.469,58.696 4.22,58.923 5,59
  region: 76.1,10.78 75.1,10.78 75.1,11.18 76.1,11.18
B.Cu:
  region: 82.78,58.923 83.531,58.696 84.222,58.326 84.828,57.828 85.326,57.222 85.696,56.531 85.923,55.78 86,55 85.923,54.22 85.696,53.469 85.326,52.778 84.828,52.172 84.222,51.674 83.531,51.304 82.78,51.077 82,51 81.22,51.077 80.469,51.304 79.778,51.674 79.172,52.172 78.674,52.778 78.304,53.469 78.077,54.22 78,55 78.077,55.78 78.304,56.531 78.674,57.222 79.172,57.828 79.778,58.326 80.469,58.696 81.22,58.923 82,59
  region: 5.78,8.923 6.531,8.696 7.222,8.326 7.828,7.828 8.326,7.222 8.696,6.531 8.923,5.78 9,5 8.923,4.22 8.696,3.469 8.326,2.778 7.828,2.172 7.222,1.674 6.531,1.304 5.78,1.077 5,1 4.22,1.077 3.469,1.304 2.778,1.674 2.172,2.172 1.674,2.778 1.304,3.469 1.077,4.22 1,5 1.077,5.78 1.304,6.531 1.674,7.222 2.172,7.828 2.778,8.326 3.469,8.696 4.22,8.923 5,9
  region: 68.78,8.923 69.531,8.696 70.222,8.326 70.828,7.828 71.326,7.222 71.696,6.531 71.923,5.78 72,5 71.923,4.22 71.696,3.469 71.326,2.778 70.828,2.172 70.222,1.674 69.531,1.304 68.78,1.077 68,1 67.22,1.077 66.469,1.304 65.778,1.674 65.172,2.172 64.674,2.778 64.304,3.469 64.077,4.22 64,5 64.077,5.78 64.304,6.531 64.674,7.222 65.172,7.828 65.778,8.326 66.469,8.696 67.22,8.923 68,9
  region: 5.78,58.923 6.531,58.696 7.222,58.326 7.828,57.828 8.326,57.222 8.696,56.531 8.923,55.78 9,55 8.923,54.22 8.696,53.469 8.326,52.778 7.828,52.172 7.222,51.674 6.531,51.304 5.78,51.077 5,51 4.22,51.077 3.469,51.304 2.778,51.674 2.172,52.172 1.674,52.778 1.304,53.469 1.077,54.22 1,55 1.077,55.78 1.304,56.531 1.674,57.222 2.172,57.828 2.778,58.326 3.469,58.696 4.22,58.923 5,59
In1.Cu:
  region: 82.78,58.923 83.531,58.696 84.222,58.326 84.828,57.828 85.326,57.222 85.696,56.531 85.923,55.78 86,55 85.923,54.22 85.696,53.469 85.326,52.778 84.828,52.172 84.222,51.674 83.531,51.304 82.78,51.077 82,51 81.22,51.077 80.469,51.304 79.778,51.674 79.172,52.172 78.674,52.778 78.304,53.469 78.077,54.22 78,55 78.077,55.78 78.304,56.531 78.674,57.222 79.172,57.828 79.778,58.326 80.469,58.696 81.22,58.923 82,59
  region: 5.78,8.923 6.531,8.696 7.222,8.326 7.828,7.828 8.326,7.222 8.696,6.531 8.923,5.78 9,5 8.923,4.22 8.696,3.469 8.326,2.778 7.828,2.172 7.222,1.674 6.531,1.304 5.78,1.077 5,1 4.22,1.077 3.469,1.304 2.778,1.674 2.172,2.172 1.674,2.778 1.304,3.469 1.077,4.22 1,5 1.077,5.78 1.304,6.531 1.674,7.222 2.172,7.828 2.778,8.326 3.469,8.696 4.22,8.923 5,9
  region: 68.78,8.923 69.531,8.696 70.222,8.326 70.828,7.828 71.326,7.222 71.696,6.531 71.923,5.78 72,5 71.923,4.22 71.696,3.469 71.326,2.778 70.828,2.172 70.222,1.674 69.531,1.304 68.78,1.077 68,1 67.22,1.077 66.469,1.304 65.778,1.674 65.172,2.172 64.674,2.778 64.304,3.469 64.077,4.22 64,5 64.077,5.78 64.304,6.531 64.674,7.222 65.172,7.828 65.778,8.326 66.469,8.696 67.22,8.923 68,9
  region: 5.78,58.923 6.531,58.696 7.222,58.326 7.828,57.828 8.326,57.222 8.696,56.531 8.923,55.78 9,55 8.923,54.22 8.696,53.469 8.326,52.778 7.828,52.172 7.222,51.674 6.531,51.304 5.78,51.077 5,51 4.22,51.077 3.469,51.304 2.778,51.674 2.172,52.172 1.674,52.778 1.304,53.469 1.077,54.22 1,55 1.077,55.78 1.304,56.531 1.674,57.222 2.172,57.828 2.778,58.326 3.469,58.696 4.22,58.923 5,59
In2.Cu:
  region: 82.78,58.923 83.531,58.696 84.222,58.326 84.828,57.828 85.326,57.222 85.696,56.531 85.923,55.78 86,55 85.923,54.22 85.696,53.469 85.326,52.778 84.828,52.172 84.222,51.674 83.531,51.304 82.78,51.077 82,51 81.22,51.077 80.469,51.304 79.778,51.674 79.172,52.172 78.674,52.778 78.304,53.469 78.077,54.22 78,55 78.077,55.78 78.304,56.531 78.674,57.222 79.172,57.828 79.778,58.326 80.469,58.696 81.22,58.923 82,59
  region: 5.78,8.923 6.531,8.696 7.222,8.326 7.828,7.828 8.326,7.222 8.696,6.531 8.923,5.78 9,5 8.923,4.22 8.696,3.469 8.326,2.778 7.828,2.172 7.222,1.674 6.531,1.304 5.78,1.077 5,1 4.22,1.077 3.469,1.304 2.778,1.674 2.172,2.172 1.674,2.778 1.304,3.469 1.077,4.22 1,5 1.077,5.78 1.304,6.531 1.674,7.222 2.172,7.828 2.778,8.326 3.469,8.696 4.22,8.923 5,9
  region: 68.78,8.923 69.531,8.696 70.222,8.326 70.828,7.828 71.326,7.222 71.696,6.531 71.923,5.78 72,5 71.923,4.22 71.696,3.469 71.326,2.778 70.828,2.172 70.222,1.674 69.531,1.304 68.78,1.077 68,1 67.22,1.077 66.469,1.304 65.778,1.674 65.172,2.172 64.674,2.778 64.304,3.469 64.077,4.22 64,5 64.077,5.78 64.304,6.531 64.674,7.222 65.172,7.828 65.778,8.326 66.469,8.696 67.22,8.923 68,9
  region: 5.78,58.923 6.531,58.696 7.222,58.326 7.828,57.828 8.326,57.222 8.696,56.531 8.923,55.78 9,55 8.923,54.22 8.696,53.469 8.326,52.778 7.828,52.172 7.222,51.674 6.531,51.304 5.78,51.077 5,51 4.22,51.077 3.469,51.304 2.778,51.674 2.172,52.172 1.674,52.778 1.304,53.469 1.077,54.22 1,55 1.077,55.78 1.304,56.531 1.674,57.222 2.172,57.828 2.778,58.326 3.469,58.696 4.22,58.923 5,59